# Altium PCB ResearchProject_V4_final.PcbDoc (part 1 of 2)
Units mm, origin at the board's own origin, x right, y up, seen from the top; angles counter-clockwise.
Board outline 152.49 x 130.17 mm, 4 copper layers (Top Layer, GND, 3V3, Bottom Layer), stack 0.603 mm thick; 141 components, 186 nets, 748 pads, 203 vias.
Unrouted connection lines stored in the file: 6.
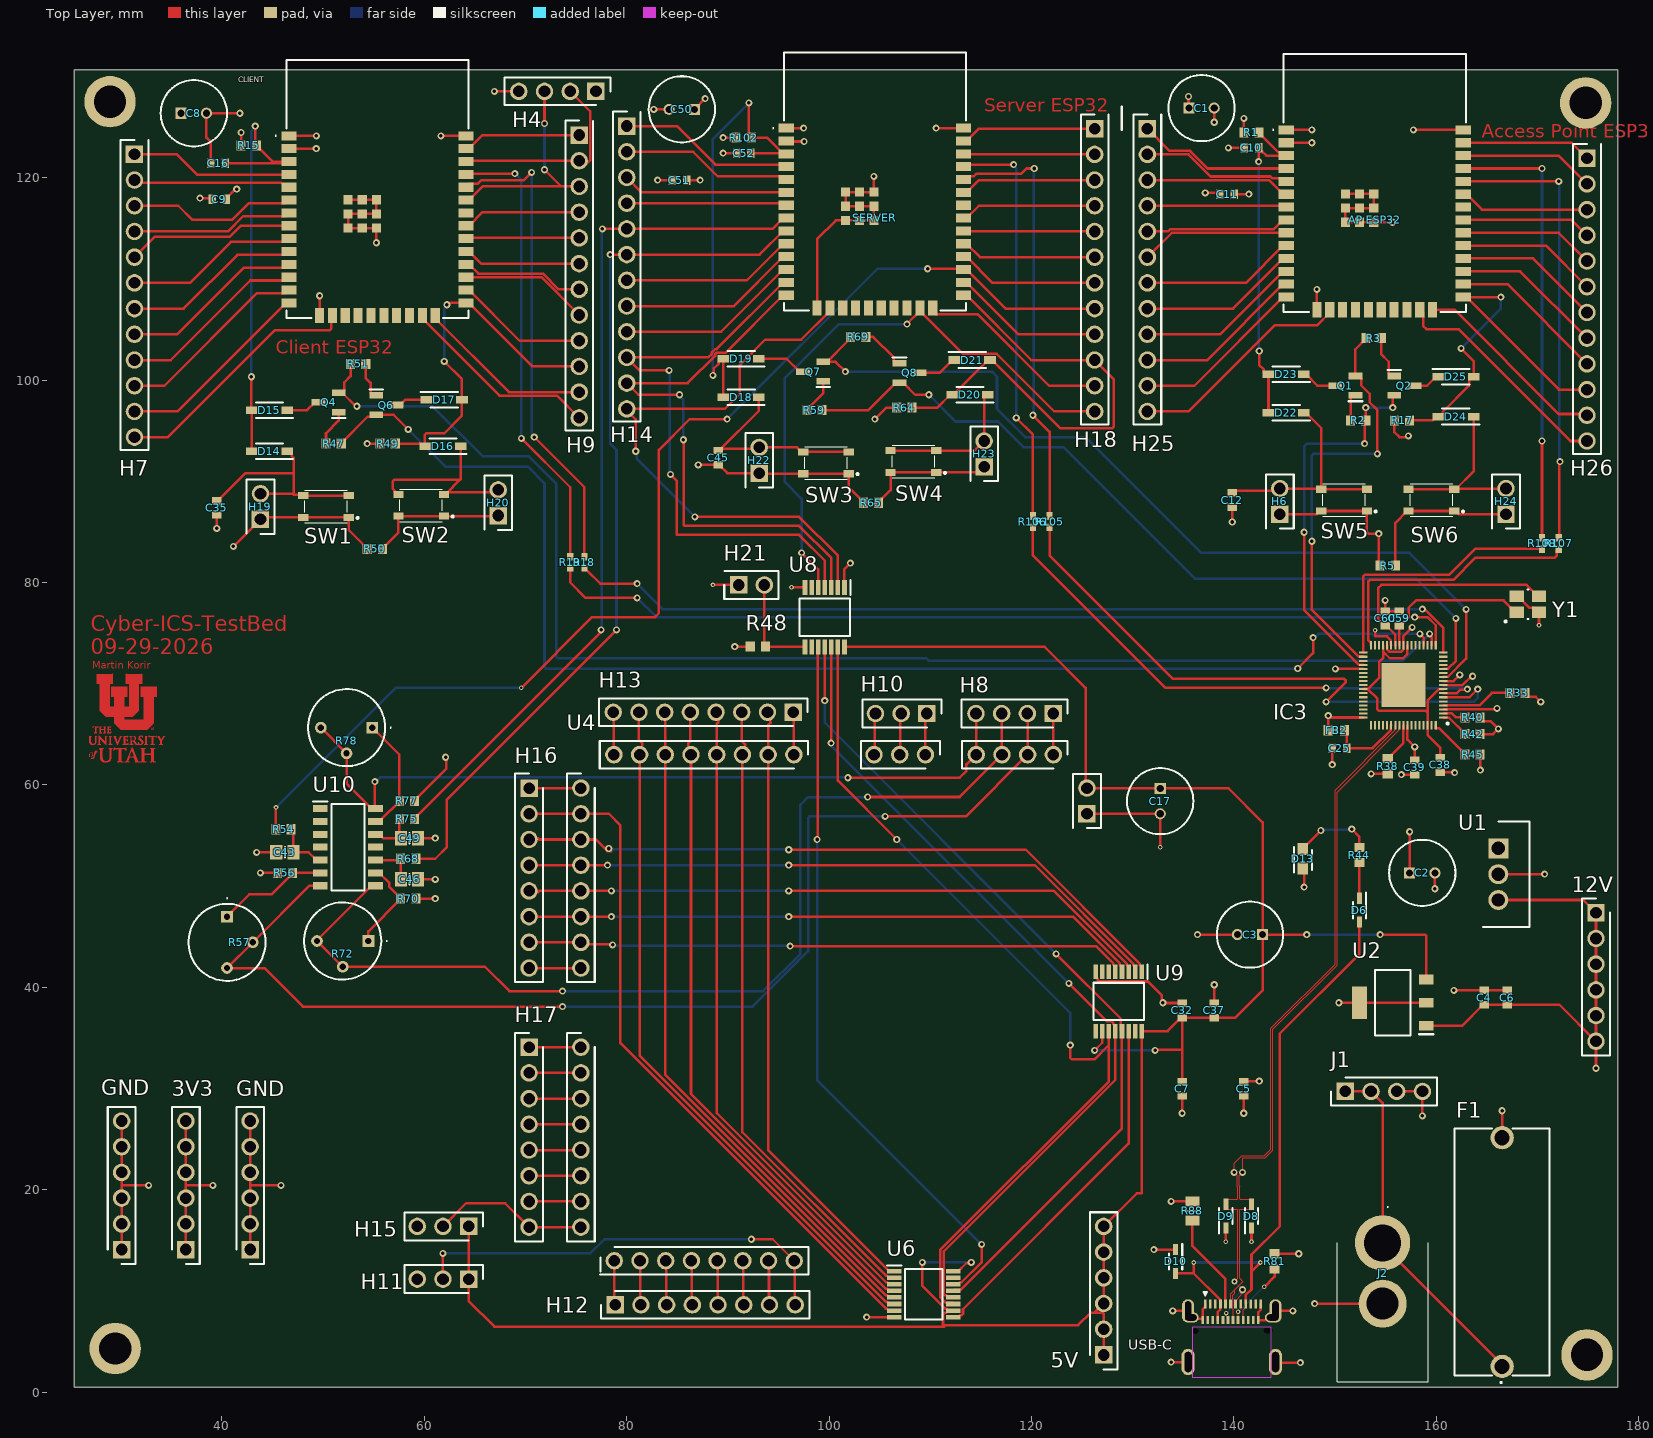
[diagram p0: Top Layer view]
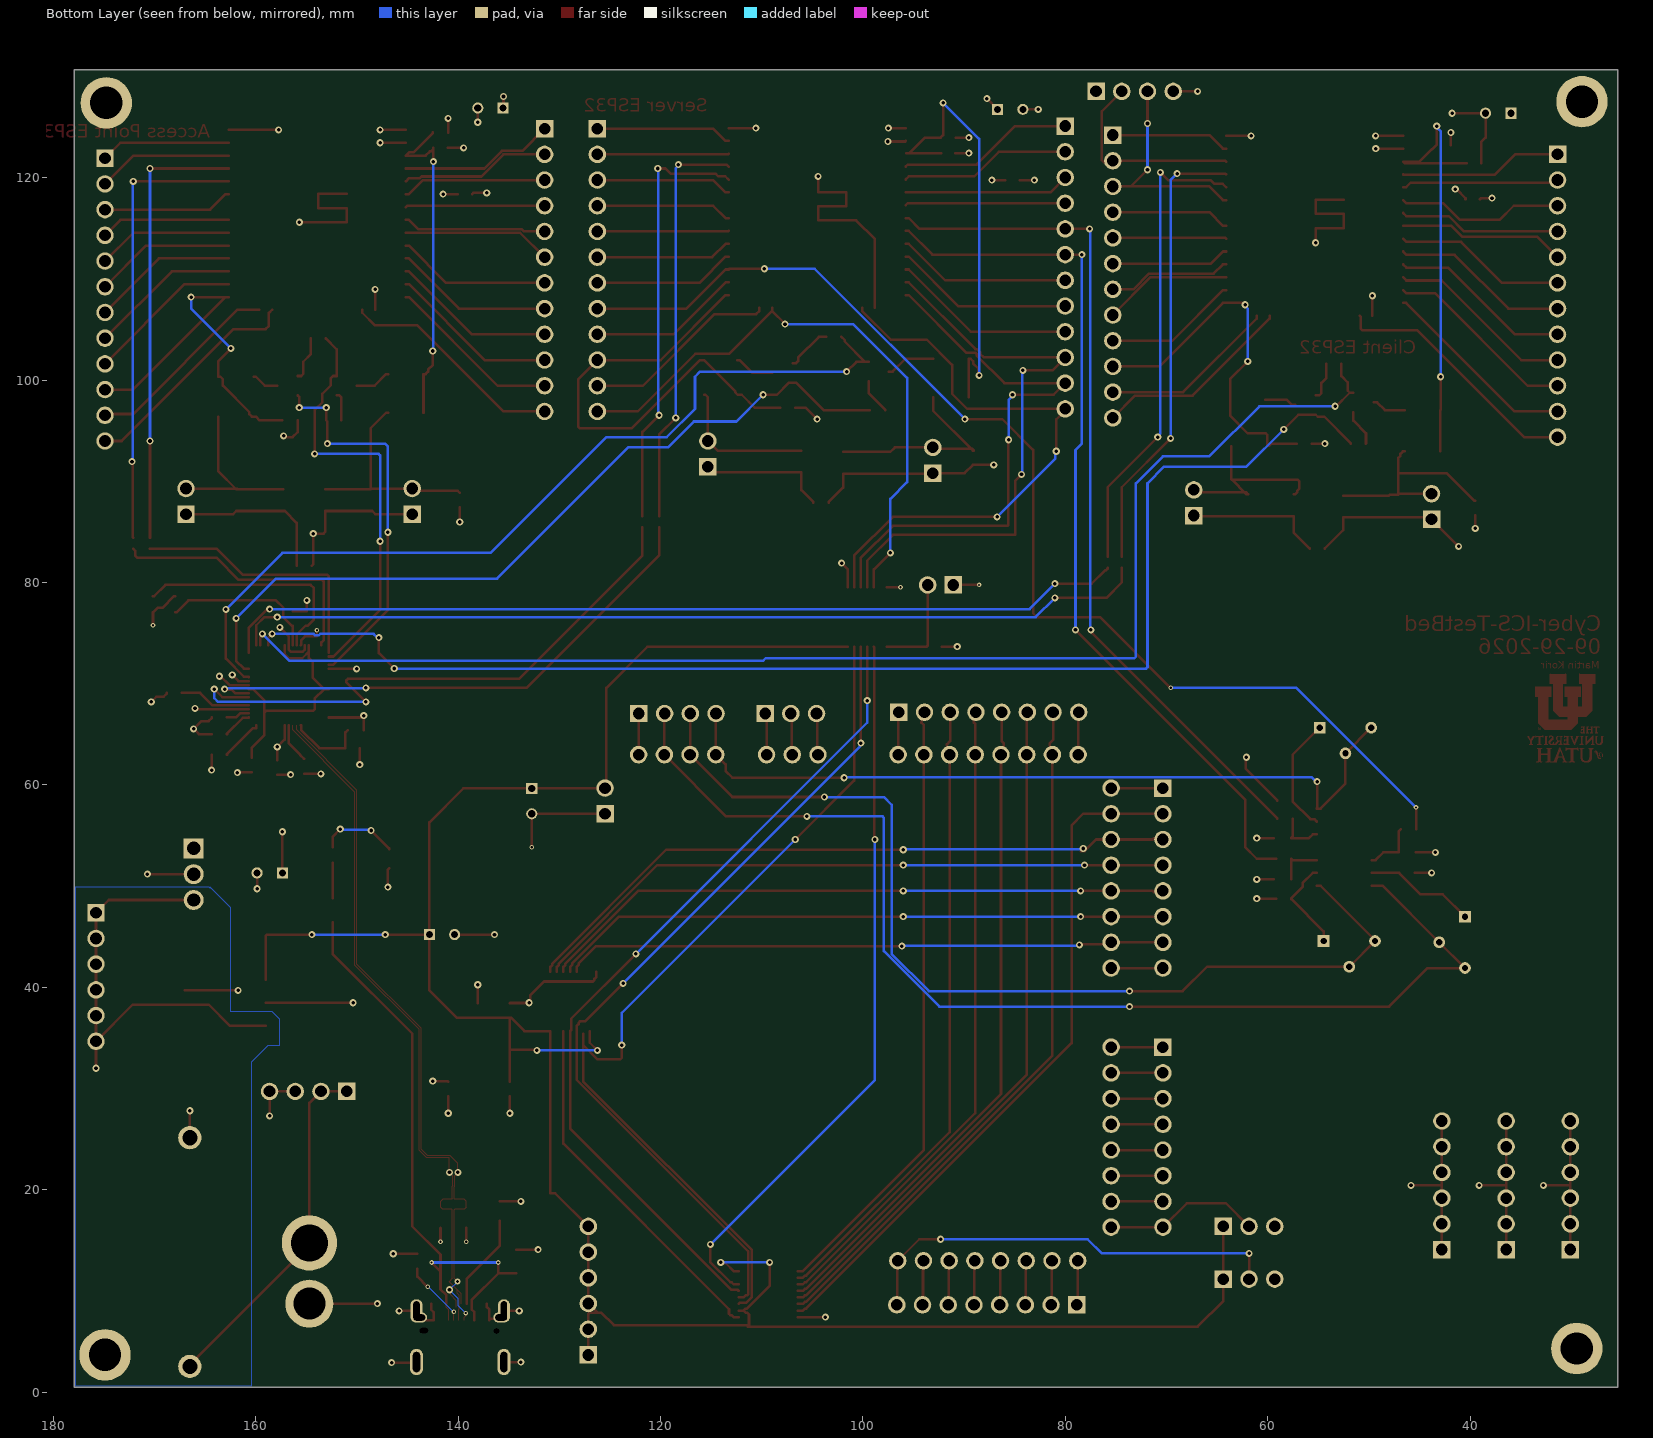
[diagram p1: Bottom Layer view, seen from below]
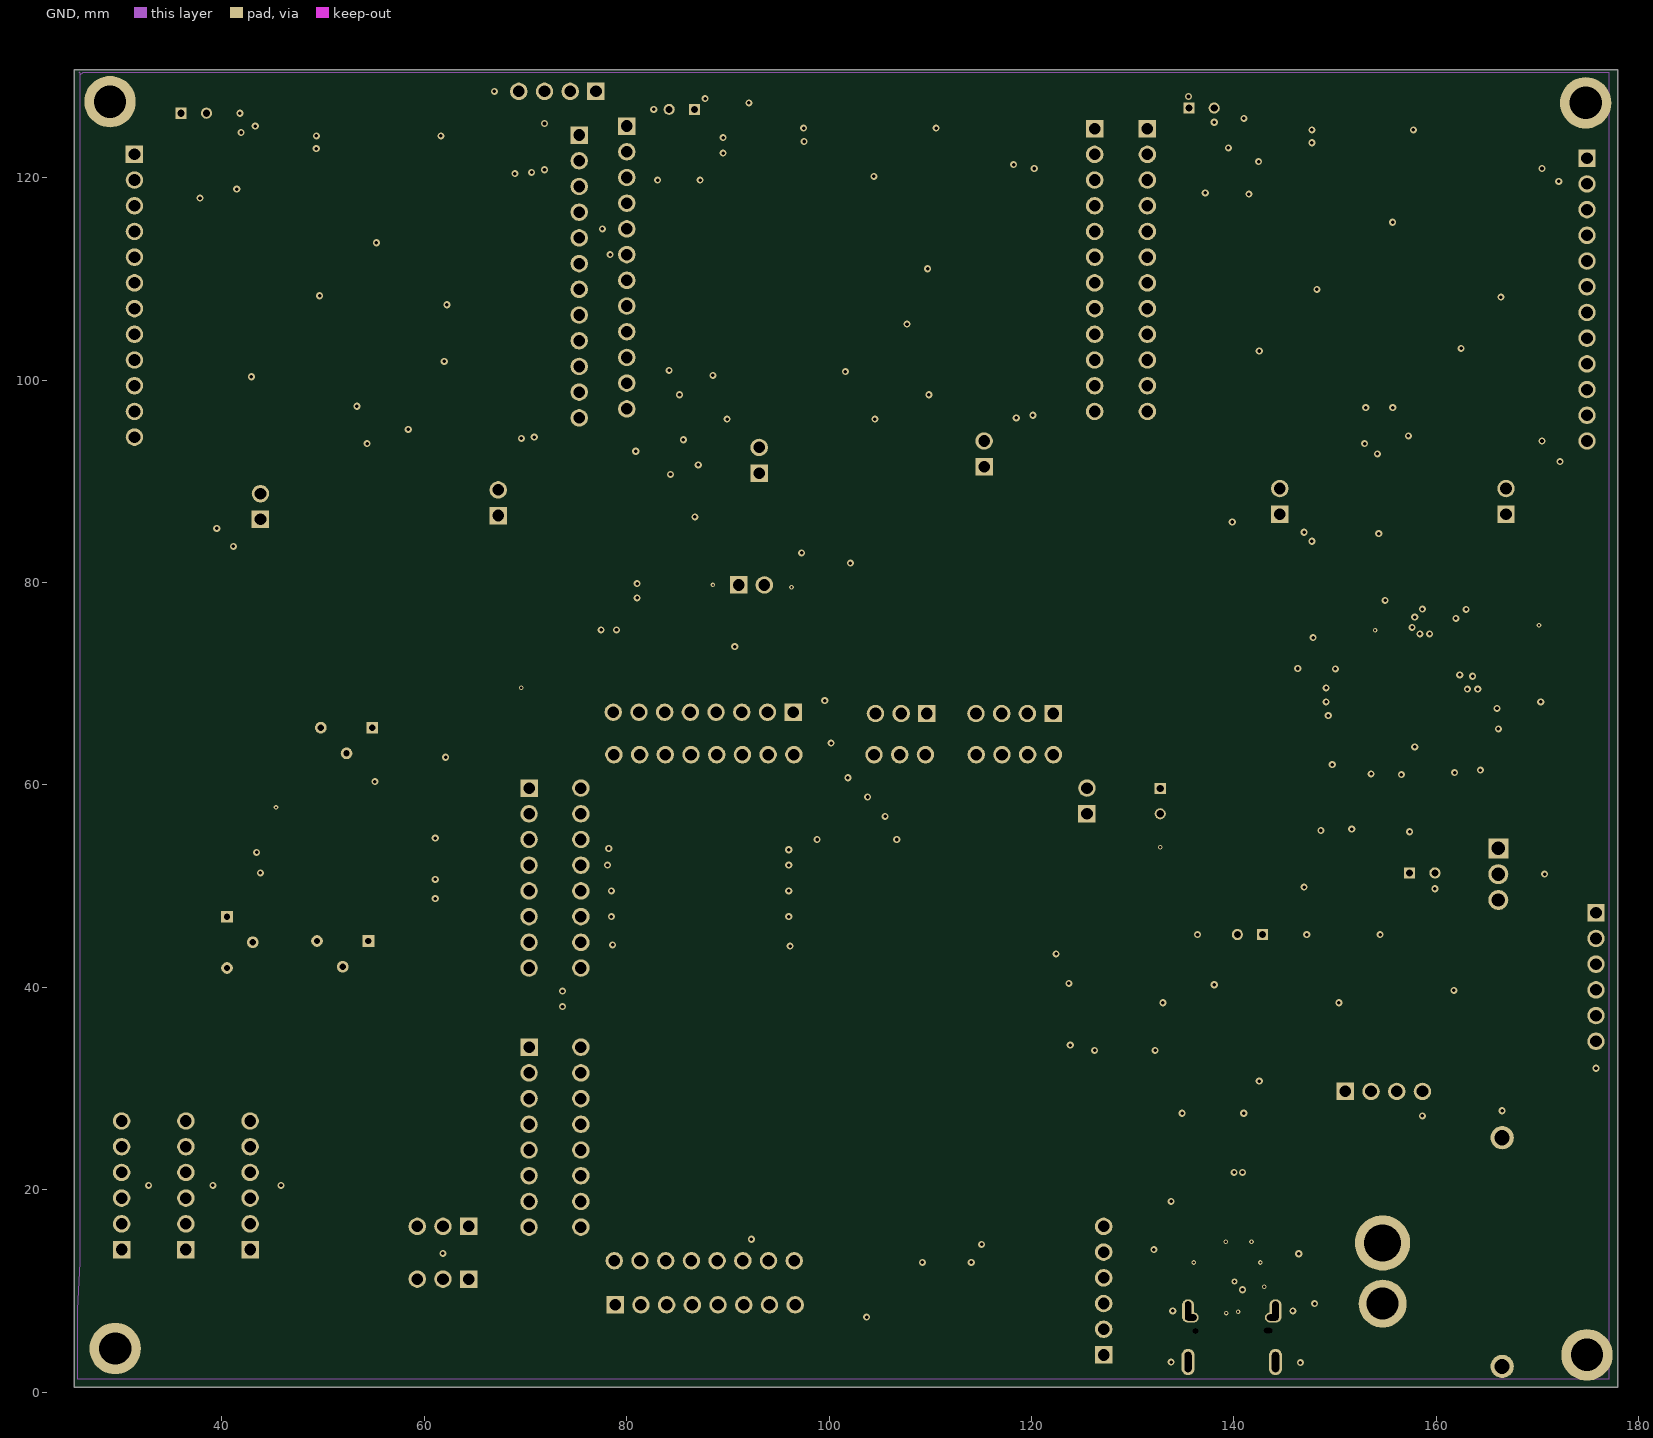
[diagram p2: GND]
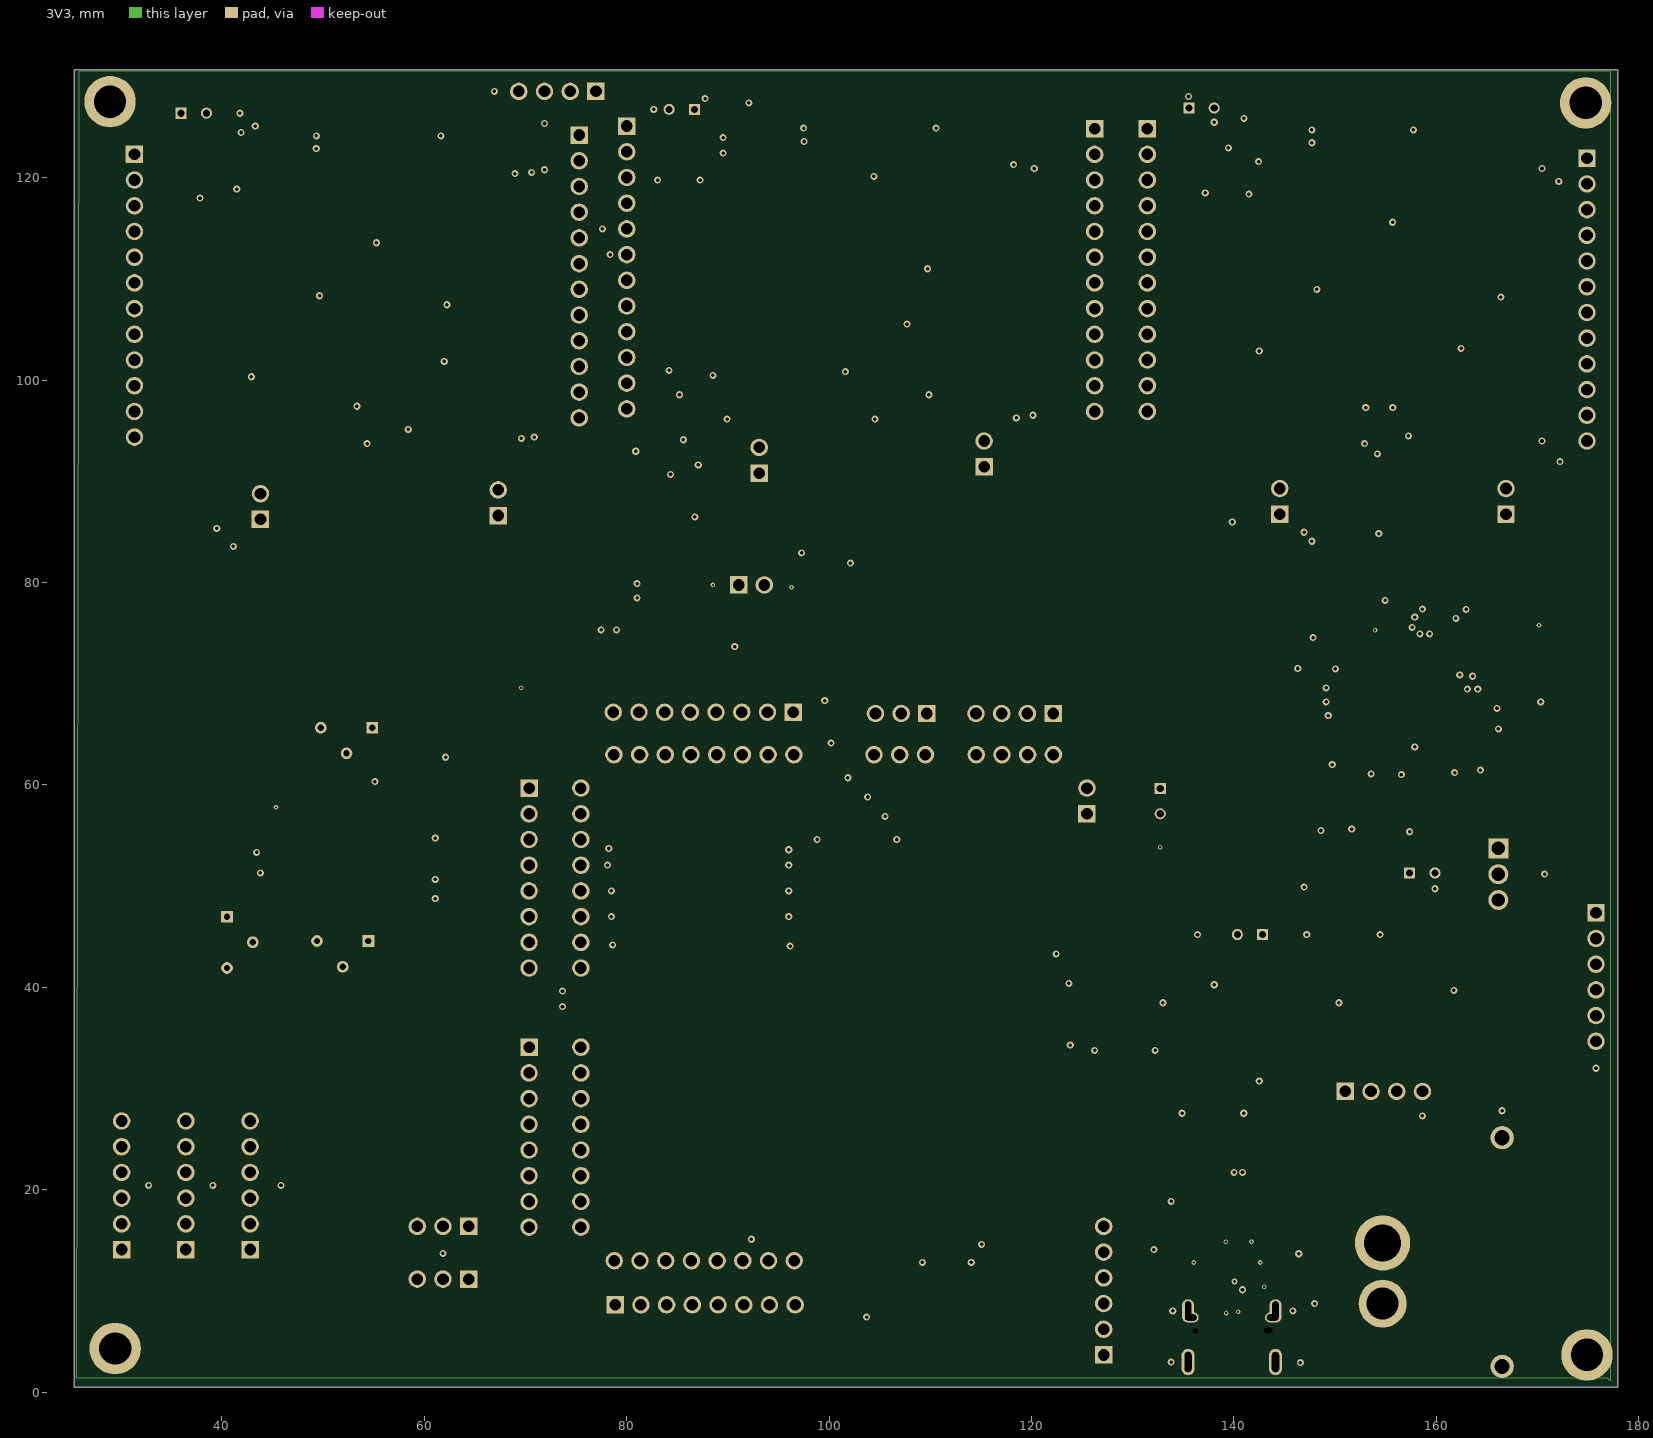
[diagram p3: 3V3]
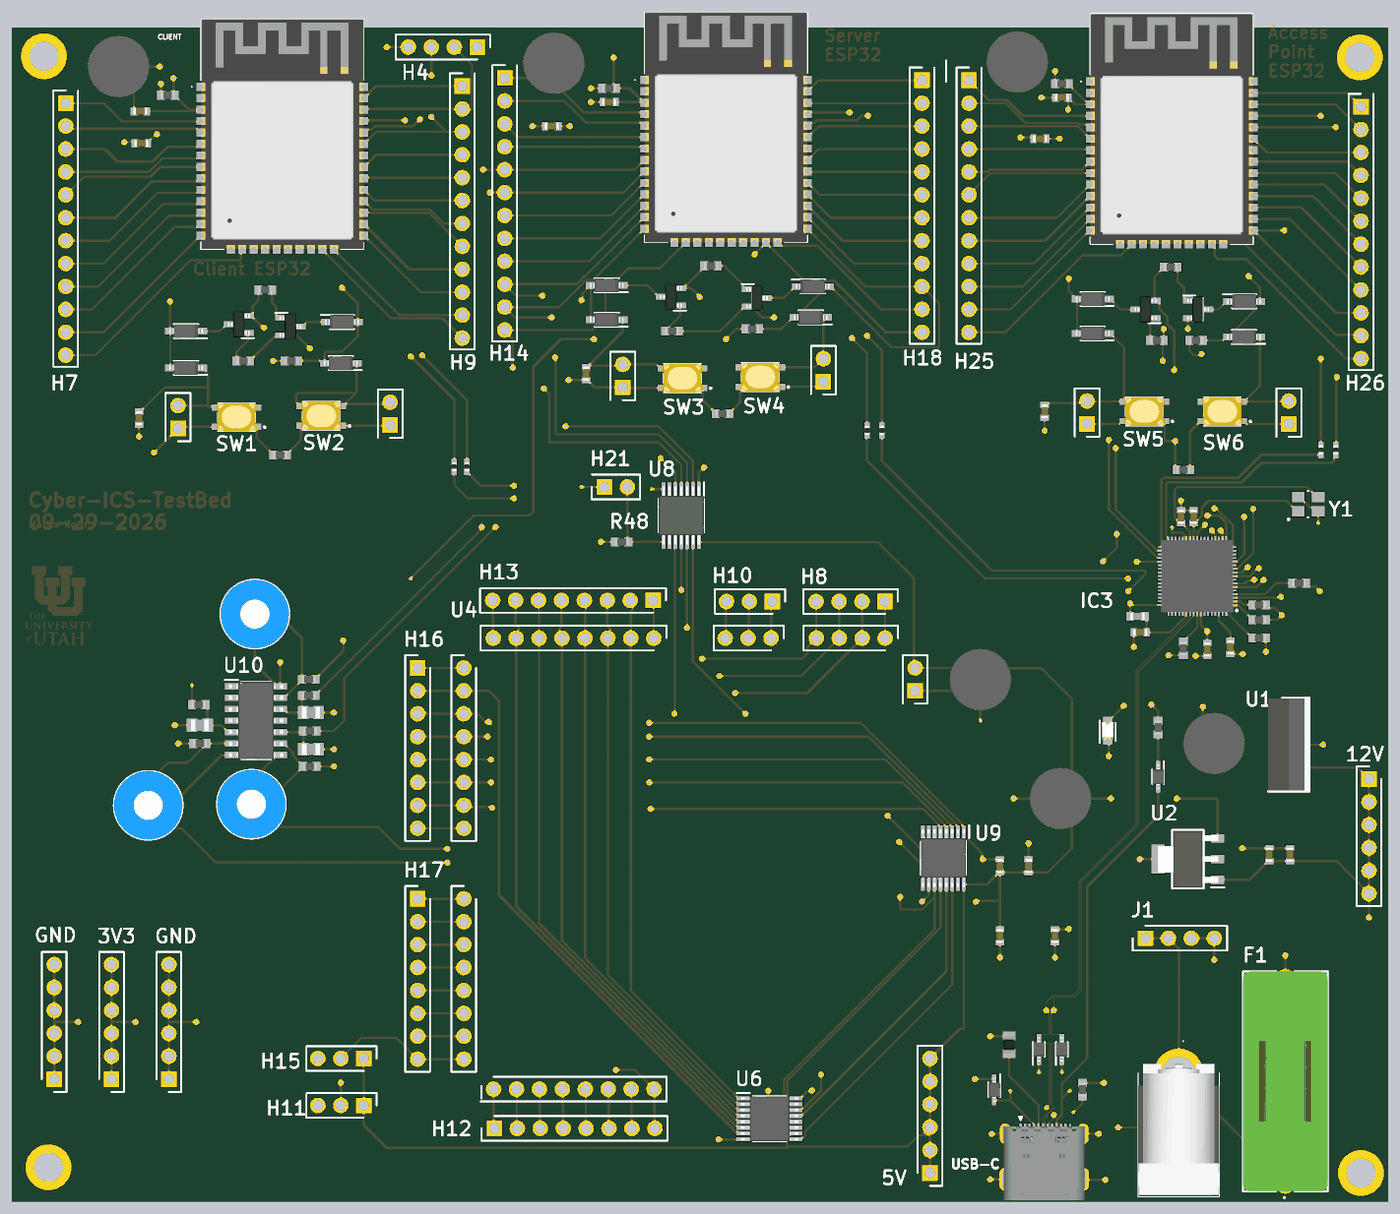
[diagram p5: 3D render of the assembled board from above, using the file's embedded part models]

## Layer stack, top to bottom
Top Solder: solder mask 0.0102, Solder Resist, Dk 3.5
Top Layer: signal copper 0.0356
Dielectric 2: prepreg 0.0711, PP-006, Dk 4.1
GND: signal copper 0.035
Dielectric 1: dielectric 0.32, FR-4, Dk 4.8
3V3: signal copper 0.035
Dielectric 3: prepreg 0.0711, PP-006, Dk 4.1
Bottom Layer: signal copper 0.0356
Bottom Solder: solder mask 0.0102, Solder Resist, Dk 3.5

## Board outline
25.424,0.508 25.424,130.683 177.913,130.683 177.913,0.508

## Design rules (kind name [scope] priority, off if disabled: settings)
BoardOutlineClearance [All] p1: gap=0.2 ignorepadtopadclearanceinfootprint=FALSE
Clearance [All] p1: gap=0.102 ignorepadtopadclearanceinfootprint=FALSE except(0.127: Arc-Via Track-Via SMDPad-Via THPad-Via Via-Via Via-Fill Via-Poly Via-Region Via-Text; 0.25: Arc-Hole Track-Hole SMDPad-Hole THPad-Hole Via-Hole Fill-Hole Poly-Hole Region-Hole Text-Hole)
ComponentClearance [All] p1: gap=0.102 collisioncheckmode=3 verticalgap=0.102 showdistances=TRUE
DiffPairsRouting [All] p1: maxlimit=0.102 minlimit=0.102 mostfreqgap=0.102 toplayer_minwidth=0.102 toplayer_maxwidth=1816.048 toplayer_prefwidth=0.102 midlayer1_minwidth=0.102 midlayer1_maxwidth=1816.048 midlayer1_prefwidth=0.102 midlayer2_minwidth=0.102 midlayer2_maxwidth=1816.048 midlayer2_prefwidth=0.102 bottomlayer_minwidth=0.102 bottomlayer_maxwidth=1816.048 bottomlayer_prefwidth=0.102 maxuncoupledlength=12.7
Height [All] p1: minheight=0 maxheight=1816.048 prefheight=12.7
HoleSize [All] p1: absolutevalues=TRUE maxlimit=6.3 minlimit=0.2 maxpercent=80.000 minpercent=20.000
HoleToHoleClearance [All] p1: gap=0.25 allowstackedmicrovias=FALSE
MinimumAnnularRing [All] p1: minimumring=0.076
MinimumSolderMaskSliver [All] p1: minsoldermaskwidth=0
PlaneClearance [All] p1: clearance=0.102
PlaneConnect PlaneConnectPowerPads [InPadClass('PowerPads')] p1: planeconnectstyle=Direct reliefexpansion=0.508 reliefentries=4 reliefconductorwidth=0.254 reliefairgap=0.254
PlaneConnect [All] p2: pad.planeconnectstyle=Relief pad.reliefexpansion=0.3 pad.reliefentries=4 pad.reliefconductorwidth=0.102 pad.reliefairgap=0.102 via.planeconnectstyle=Direct via.reliefexpansion=0.3 via.reliefentries=4 via.reliefconductorwidth=0.127 via.reliefairgap=0.127
PolygonConnect PolygonConnectPowerPads [All vs (InPadClass('PowerPads'))] p1: connectstyle=Direct reliefconductorwidth=0.254 reliefentries=4 polygonreliefangle="90 Angle" airgapwidth=0.254
PolygonConnect [All] p2: thpad.connectstyle=Relief thpad.reliefconductorwidth=0.102 thpad.reliefentries=4 thpad.polygonreliefangle="90 Angle" thpad.airgapwidth=0.102 smdpad.connectstyle=Relief smdpad.reliefconductorwidth=0.102 smdpad.reliefentries=4 smdpad.polygonreliefangle="90 Angle" smdpad.airgapwidth=0.102 via.connectstyle=Direct via.reliefconductorwidth=0.127 via.reliefentries=4 via.polygonreliefangle="90 Angle" via.airgapwidth=0.127
RoutingVias RoutingVias_USBC [All] p1: holewidth=0.225 width=0.45 viastyle="Through Hole" minholewidth=0.225 minwidth=0.45 maxholewidth=0.225 maxwidth=0.45
RoutingVias [All] p2: holewidth=0.35 width=0.7 viastyle="Through Hole" minholewidth=0.35 minwidth=0.7 maxholewidth=0.35 maxwidth=0.7
SilkToSilkClearance [All] p1: silktosilkclearance=0
SilkToSolderMaskClearance [IsPad] p1: minsilkscreentomaskgap=0.102 clearancetoexposedcopper=TRUE
SolderMaskExpansion [All] p1: expansion=0.075 istentingtop=FALSE
SupplyNets "Schematic Supply Nets_4" [InNet('3V3')] p1: voltage=0.000
SupplyNets "Schematic Supply Nets_3" [InNet('USB_VBUS')] p2: voltage=0.000
SupplyNets "Schematic Supply Nets_2" [InNet('+12.0')] p3: voltage=0.000
SupplyNets "Schematic Supply Nets_1" [InNet('+5.0')] p4: voltage=0.000
SupplyNets "Schematic Supply Nets" [InNet('GND')] p5: voltage=0.000
Width [All] p1: maxlimit=2 minlimit=0.1 preferedwidth=0.25 minimp=50.000000 maximp=50.000000 favimp=50.000000
20 further rules are at their usual default settings.

## Classes and differential pairs
differential pair USB: +USB_P -USB_N

## Components (designator, comment, footprint, x,y, rotation, side; value= is the part's Value field where it differs from the comment)
3V3 "Header" Header_1X6 36.449,14.097 r90 top (schematic designator H5)
5V "Header" Header_1X6 127.127,3.683 r90 top (schematic designator H3)
12V "Header" Header_1X6 175.768,47.371 r270 top (schematic designator H1)
"AP ESP32" "ESP32-WROOM-32E-N8" ESP32WROOM32EN8 153.911,119.454 r0 top (schematic designator U7)
C1 "100u" CAPTH6.3x11 135.549,126.873 r0 top
C2 "100u" CAPTH6.3x11 157.353,51.308 r0 top
C3 "100u" CAPTH6.3x11 142.835,45.212 r180 top
C4 "100n" CAP0603 164.719,38.989 r90 top
C5 "100n" CAP0603 140.97,29.972 r270 top
C6 "100n" CAP0603 167.005,38.989 r90 top
C7 "100n" CAP0603 134.874,29.972 r270 top
C8 "100u" CAPTH6.3x11 35.981,126.365 r0 top
C9 "1u" CAP0603 39.751,117.856 r0 top
C10 "1u" CAP0603 141.732,122.936 r180 top
C11 "1u" CAP0603 139.319,118.364 r0 top
C12 "100n" CAP0603 139.827,88.138 r90 top
C16 "1u" CAP0603 39.624,121.412 r180 top
C17 "100u" CAPTH6.3x11 132.715,59.65 r270 top
C25 "100n" CAP0603 150.42,63.627 r180 top
C32 "100n" CAP0603 134.874,37.719 r90 top
C35 "100n" CAP0603 39.497,87.376 r90 top
C37 "100n" CAP0603 138.049,37.719 r90 top
C38 "3.3u" CAP0603 160.401,61.976 r270 top
C39 "1u" CAP0603 157.861,61.722 r270 top
C43 "10u" CAP0805 46.228,53.34 r180 top
C45 "100n" CAP0603 89.027,92.329 r90 top
C46 "10u" CAP0805 58.547,50.673 r0 top
C49 "10u" CAP0805 58.547,54.737 r0 top
C50 "100u" CAPTH6.3x11 86.701,126.746 r180 top
C51 "1u" CAP0603 85.217,119.761 r180 top
C52 "1u" CAP0603 91.567,122.428 r180 top
C59 "27p" CAP0603 156.337,76.454 r90 top
C60 "27p" CAP0603 154.94,76.454 r90 top
CLIENT "ESP32-WROOM-32E-N8" ESP32WROOM32EN8 55.372,118.872 r0 top (schematic designator U3)
D6 "BAT60B" SOD323 152.4,47.625 r270 top
D8 "5V" SOD323 141.732,17.399 r90 top
D9 "5V" SOD323 139.192,17.399 r90 top
D10 "5V" SOD323 134.239,12.922 r270 top
D13 "LED" LEDM2012X80N 146.812,52.705 r90 top
D14 "1N4148" SOD123 44.704,92.964 r180 top
D15 "1N4148" SOD123 44.704,97.028 r180 top
D16 "1N4148" SOD123 61.849,93.472 r180 top
D17 "1N4148" SOD123 61.976,98.044 r0 top
D18 "1N4148" SOD123 91.313,98.298 r180 top
D19 "1N4148" SOD123 91.313,102.108 r180 top
D20 "1N4148" SOD123 113.919,98.552 r180 top
D21 "1N4148" SOD123 114.145,101.981 r0 top
D22 "1N4148" SOD123 145.161,96.774 r180 top
D23 "1N4148" SOD123 145.161,100.584 r180 top
D24 "1N4148" SOD123 161.925,96.393 r180 top
D25 "1N4148" SOD123 161.925,100.33 r0 top
F1 "Fuse" "Fuse Holder 5x20mm" 166.497,13.846 r90 top
FB2 "1.5k @ 100MHz" BEADC0603 150.114,65.405 r0 top
GND "Header" Header_1X6 30.099,14.097 r90 top (schematic designator H34)
GND "Header" Header_1X6 42.799,14.097 r90 top (schematic designator H2)
H4 "Header" Header_1X4 76.962,128.524 r180 top
H6 "Header" Header_1X2 144.526,86.741 r90 top
H7 "Header" Header_1X12 31.369,122.301 r270 top
H8 "Header" Header_1X4 122.13,67.055 r180 top
H9 "Header" Header_1X12 75.311,124.206 r270 top
H10 "Header" Header_1X3 109.661,67.055 r180 top
H11 "Header" Header_1X3 64.389,11.176 r180 top
H12 "Header" Header_1X8 78.867,8.636 r0 top
H13 "Header" Header_1X8 96.453,67.182 r180 top
H14 "Header" Header_1X12 80.01,125.095 r270 top
H15 "Header" Header_1X3 64.389,16.383 r180 top
H16 "Header" Header_1X8 70.358,59.689 r270 top
H17 "Header" Header_1X8 70.358,34.089 r270 top
H18 "Header" Header_1X12 126.238,124.841 r270 top
H19 "Header" Header_1X2 43.815,86.233 r90 top
H20 "Header" Header_1X2 67.31,86.614 r90 top
H21 "Header" Header_1X2 91.059,79.756 r0 top
H22 "Header" Header_1X2 93.091,90.805 r90 top
H23 "Header" Header_1X2 115.316,91.44 r90 top
H24 "Header" Header_1X2 166.878,86.741 r90 top
H25 "Header" Header_1X12 131.445,124.841 r270 top
H26 "Header" Header_1X12 174.879,121.92 r270 top
IC3 "FT4232HPQ-TRAY" QFN40P800X800X80-69N-D 156.737,69.863 r180 top
J1 "Header" Header_1X4 151.003,29.718 r0 top
J2 "PJ-037AH" PJ037AH 154.686,14.75 r90 top
Q1 "BC817-40" SOT23 151.003,99.441 r90 top
Q2 "BC817-40" SOT23 156.845,99.441 r270 top
Q4 "BC817-40" SOT23 50.546,97.79 r90 top
Q6 "BC817-40" SOT23 56.261,97.536 r270 top
Q7 "BC817-40" SOT23 98.425,100.838 r90 top
Q8 "BC817-40" SOT23 107.95,100.711 r270 top
R1 "10k" RESC0603 141.732,124.46 r0 top
R2 "100k" RESC0603 152.273,96.012 r180 top
R3 "100k" RESC0603 153.797,104.14 r0 top
R5 "1k" RESC0603 155.194,81.661 r180 top
R15 "10k" RESC0603 42.66,123.19 r0 top
R17 "20k" RESC0603 156.603,96.012 r180 top
R18 "0" RESC0402 75.819,82 r90 top
R19 "0" RESC0402 74.422,82 r90 top
R33 "1k" RESC0603 168.021,69.088 r0 top
R38 "12k" RESC0603 155.194,61.849 r270 top
R40 "10k" RESC0603 163.576,66.675 r180 top
R42 "10k" RESC0603 163.576,65.024 r180 top
R44 "2.2k" RESC0603 152.4,53.074 r270 top
R45 "10k" RESC0603 163.576,62.992 r0 top
R47 "100k" RESC0603 51.054,93.726 r180 top
R48 "10k" RESC0603 92.964,73.66 r180 top
R49 "20k" RESC0603 56.388,93.726 r180 top
R50 "1k" RESC0603 55.118,83.312 r180 top
R51 "100k" RESC0603 53.467,101.6 r0 top
R54 "10k" RESC0603 46.101,55.626 r0 top
R56 "12k" RESC0603 46.24,51.308 r0 top
R57 "10k" 3339P1103LF 40.513,46.99 r270 top
R59 "100k" RESC0603 98.552,97.028 r180 top
R64 "20k" RESC0603 107.43,97.282 r180 top
R65 "1k" RESC0603 104.14,87.884 r180 top
R68 "10k" RESC0603 58.42,52.705 r180 top
R69 "100k" RESC0603 102.87,104.267 r0 top
R70 "12k" RESC0603 58.42,48.768 r180 top
R72 "10k" 3339P1103LF 54.483,44.577 r180 top
R75 "10k" RESC0603 58.293,56.642 r180 top
R77 "12k" RESC0603 58.293,58.42 r180 top
R78 "10k" 3339P1103LF 54.864,65.659 r180 top
R81 "12k" RESC0603 144.018,12.935 r90 top
R88 "5.11k" RESC0805 135.89,17.907 r90 top
R102 "10k" RESC0603 91.567,123.952 r0 top
R105 "0" RESC0402 121.793,86.021 r90 top
R106 "0" RESC0402 120.142,86.021 r90 top
R107 "0" RESC0402 172.085,83.862 r90 top
R108 "0" RESC0402 170.434,83.862 r90 top
SERVER "ESP32-WROOM-32E-N8" ESP32WROOM32EN8 104.521,119.634 r0 top (schematic designator U13)
SW1 "Tactile Switch - 1" "Tactile Button 4.2mm x 3.2mm" 50.292,87.503 r180 top
SW2 "Tactile Switch - 1" "Tactile Button 4.2mm x 3.2mm" 59.69,87.63 r180 top
SW3 "Tactile Switch - 1" "Tactile Button 4.2mm x 3.2mm" 99.695,91.821 r180 top
SW4 "Tactile Switch - 1" "Tactile Button 4.2mm x 3.2mm" 108.331,91.948 r180 top
SW5 "Tactile Switch - 1" "Tactile Button 4.2mm x 3.2mm" 150.876,88.138 r180 top
SW6 "Tactile Switch - 1" "Tactile Button 4.2mm x 3.2mm" 159.512,88.138 r180 top
U1 "LD1086V33-DG" TO-220-3 166.116,53.731 r270 top
U2 "AZ1117CH2-5.0TRG1" SOT223 155.702,38.481 r180 top
U4 "eACE 5150v5" eACEv5150 125.176,62.689 r270 top
U6 "74HC595" TSSOP16 109.351,9.693 r0 top
U8 "LSF0204DPWR" TSSOP14 99.568,76.581 r270 top
U9 "74HC595" TSSOP16 128.61,38.604 r270 top
U10 "LM324" SOIC14 52.451,53.848 r0 top
USB-C "DX07S024JJ3R1300" JAE-DX07S024JJ3_V 139.783,6.031 r0 top (schematic designator CN1)
Y1 "LFXTAL056346" WE-XTAL_LFXTAL056346 169.037,77.851 r0 top

## Footprints (in the part's own frame and the unit in brackets; to place one, negate y for a bottom-side part, rotate by r counter-clockwise, add the part's x,y. Pads: shape width x height; smd on the part's side, far side on the other; paste and mask are expansions set on the pad)
3339P1103LF [mm]
  rect 1.155x1.155 hole 0.63: 1(0,0)
  round 1.155 hole 0.63: 2(2.54,2.54) 3(5.08,0)
  silkscreen extent -1.86,-3.81 6.35,3.81, body extent -1.27,-3.81 6.35,3.81, height 6.42
BEADC0603 [mm]
  rect 0.9x1 smd: 1(-0.8,0) 2(0.8,0)
  silkscreen extent 0,-0.3 0,0.3, body extent -0.8,-0.4 0.8,0.4, height 0.95
CAP0603 [mm]
  rect 0.73x0.94 smd: 1(-0.71,0) 2(0.71,0)
  body extent -0.8,-0.4 0.8,0.4, height 0.9
CAP0805 [mm]
  rect 1.2x1.45 smd: 1(-0.85,0) 2(0.85,0)
  silkscreen extent 0,-0.53 0,0.53, body extent -1,-0.63 1,0.63, height 1.1
CAPTH6.3x11 [mm]
  rect 1.1x1.1 hole 0.7: 1(0,0)
  round 1.1 hole 0.7: 2(2.5,0)
  silkscreen extent -2.02,-3.27 4.52,3.27, body extent -2.14,-3.4 4.65,3.4, height 13
eACEv5150 [mm]
  rect 1.725x1.725 hole 1.15: 1(5.54,0.3)
  round 1.725 hole 1.15: 2(3,0.3) 3(-0.3,-3.02) 4(-0.3,-5.56) 5(-0.3,-8.1) 6(-0.3,-10.64) 7(-0.3,-15.66) 8(-0.3,-18.2) 9(-0.3,-20.74) 10(-0.3,-28.66) 11(-0.3,-31.2) 12(-0.3,-33.74) 13(-0.3,-36.28) 14(-0.3,-38.82) 15(-0.3,-41.36) 16(-0.3,-43.9) 17(-0.3,-46.44) 18(3,-49.7) 19(5.54,-49.7) 20(8.08,-49.7) 21(10.62,-49.7) 22(13.16,-49.7) 23(15.7,-49.7) 24(18.24,-49.7) 25(20.78,-49.7) 26(28.6,-49.7) 27(31.14,-49.7) 28(33.68,-49.7) 29(36.22,-49.7) 30(38.76,-49.7) 31(41.3,-49.7) 32(43.84,-49.7) 33(46.38,-49.7) 34(49.7,-46.4) 35(49.7,-43.86) 36(49.7,-41.32) 37(49.7,-38.78) 38(49.7,-36.24) 39(49.7,-33.7) 40(49.7,-31.16) 41(49.7,-28.62)
  silkscreen extent -1.67,-51.07 51.07,1.68, body extent 0,-49.34 49.38,0.04, height 8.89
ESP32WROOM32EN8 [mm]
  rect 1.5x0.9 smd: 1(-8.75,5.26) 2(-8.75,3.99) 3(-8.75,2.72) 4(-8.75,1.45) 5(-8.75,0.18) 6(-8.75,-1.09) 7(-8.75,-2.36) 8(-8.75,-3.63) 9(-8.75,-4.9) 10(-8.75,-6.17) 11(-8.75,-7.44) 12(-8.75,-8.71) 13(-8.75,-9.98) 14(-8.75,-11.25) 25(8.75,-11.25) 26(8.75,-9.98) 27(8.75,-8.71) 28(8.75,-7.44) 29(8.75,-6.17) 30(8.75,-4.9) 31(8.75,-3.63) 32(8.75,-2.36) 33(8.75,-1.09) 34(8.75,0.18) 35(8.75,1.45) 36(8.75,2.72) 37(8.75,3.99) 38(8.75,5.26)
  rect 0.9x1.5 smd: 15(-5.715,-12.5) 16(-4.445,-12.5) 17(-3.175,-12.5) 18(-1.905,-12.5) 19(-0.635,-12.5) 20(0.635,-12.5) 21(1.905,-12.5) 22(3.175,-12.5) 23(4.445,-12.5) 24(5.715,-12.5)
  rect 0.9x0.9 smd: 39(-2.9,-1.06) 40(-2.9,-2.46) 41(-2.9,-3.86) 42(-1.5,-3.86) 43(-0.1,-3.86) 44(-0.1,-2.46) 45(-0.1,-1.06) 46(-1.5,-1.06) 47(-1.5,-2.46)
  silkscreen extent -10.1,-12.75 9,12.75, body extent -9,-12.75 9,12.75, height 3.13
"Fuse Holder 5x20mm" [mm]
  round 2.3 hole 1.5: 1(-11.3,0) 2(11.3,0)
  silkscreen extent -12.95,-4.7 12.2,4.7, body extent -12.2,-4.7 12.2,4.7, height 13.36
Header_1X2 [mm]
  rect 1.725x1.725 hole 1.15: 1(0,0)
  round 1.725 hole 1.15: 2(2.54,0)
  silkscreen extent -1.42,-1.38 3.95,1.37
Header_1X3 [mm]
  rect 1.725x1.725 hole 1.15: 1(0,0)
  round 1.725 hole 1.15: 2(2.54,0) 3(5.08,0)
  silkscreen extent -1.42,-1.37 6.35,1.37
Header_1X4 [mm]
  rect 1.725x1.725 hole 1.15: 1(0,0)
  round 1.725 hole 1.15: 2(2.54,0) 3(5.08,0) 4(7.62,0)
  silkscreen extent -1.42,-1.37 9.04,1.37
Header_1X6 [mm]
  rect 1.725x1.725 hole 1.15: 1(0,0)
  round 1.725 hole 1.15: 2(2.54,0) 3(5.08,0) 4(7.62,0) 5(10.16,0) 6(12.7,0)
  silkscreen extent -1.42,-1.37 14.1,1.37
Header_1X8 [mm]
  rect 1.725x1.725 hole 1.15: 1(0,0)
  round 1.725 hole 1.15: 2(2.54,0) 3(5.08,0) 4(7.62,0) 5(10.16,0) 6(12.7,0) 7(15.24,0) 8(17.78,0)
  silkscreen extent -1.42,-1.37 19.18,1.37
Header_1X12 [mm]
  rect 1.725x1.725 hole 1.15: 1(0,0)
  round 1.725 hole 1.15: 2(2.54,0) 3(5.08,0) 4(7.62,0) 5(10.16,0) 6(12.7,0) 7(15.24,0) 8(17.78,0) 9(20.32,0) 10(22.86,0) 11(25.4,0) 12(27.94,0)
  silkscreen extent -1.42,-1.37 29.21,1.37
JAE-DX07S024JJ3_V [mm] "THD, 24-Leads, Body 8.17x8.94mm, Pitch 0.5mm"
  oval 1.2x2.3 hole 0.6 slot 1.9 at 90 deg: 1(-4.32,2) 2(4.32,2)
  oval 1.5x1 hole 0.6 slot 1.1 at 0 deg: 1(-4.02,1.35) 2(4.02,1.35)
  oval 1.3x2.6 hole 0.7 slot 2 at 90 deg: 3(-4.32,-3.05) 4(4.32,-3.05)
  rrect25% 0.27x0.9 smd: A1(-2.625,2.7) A2(-2.125,2.7) A3(-1.625,2.7) A4(-1.125,2.7) A5(-0.625,2.7) A6(-0.125,2.7) A7(0.375,2.7) A8(0.875,2.7) A9(1.375,2.7) A10(1.875,2.7) A11(2.375,2.7) A12(2.875,2.7)
  rrect25% 0.27x0.8 smd: B1(2.625,1.1) B2(2.125,1.1) B3(1.625,1.1) B4(1.125,1.1) B5(0.625,1.1) B6(0.125,1.1) B7(-0.375,1.1) B8(-0.875,1.1) B9(-1.375,1.1) B10(-1.875,1.1) B11(-2.375,1.1) B12(-2.875,1.1)
  round 0 hole 0.6 unplated: H1(-3.6,0)
  round 0 hole 0.5 slot 0.85 at 0 deg unplated: H2(3.6,0.065)
  Top Layer keep-out region: -3.9,-4.55 3.9,-4.55 3.9,0.4 -3.9,0.4
  silkscreen extent -2.83,3.49 -2.43,3.89, body extent -4.47,-5.35 4.47,2.8, height 3.16
LEDM2012X80N [mm]
  rect 1.2x1.05 smd: 1(-0.95,0) 2(0.95,0)
  silkscreen extent -1.33,-0.89 1.14,0.89, body extent -1,-0.63 1,0.63, height 0.7
PJ037AH [mm]
  round 5.46 hole 3.64: 1(0,0)
  round 4.74 hole 3.16: 2(-6,0)
  silkscreen extent -13.7,-4.5 3.6,4.5, body extent -13.5,-4.5 1,4.5, height 11
QFN40P800X800X80-69N-D [mm]
  rect 0.85x0.2 smd: 1(-3.95,3.2) 2(-3.95,2.8) 3(-3.95,2.4) 4(-3.95,2) 5(-3.95,1.6) 6(-3.95,1.2) 7(-3.95,0.8) 8(-3.95,0.4) 9(-3.95,0) 10(-3.95,-0.4) 11(-3.95,-0.8) 12(-3.95,-1.2) 13(-3.95,-1.6) 14(-3.95,-2) 15(-3.95,-2.4) 16(-3.95,-2.8) 17(-3.95,-3.2) 35(3.95,-3.2) 36(3.95,-2.8) 37(3.95,-2.4) 38(3.95,-2) 39(3.95,-1.6) 40(3.95,-1.2) 41(3.95,-0.8) 42(3.95,-0.4) 43(3.95,0) 44(3.95,0.4) 45(3.95,0.8) 46(3.95,1.2) 47(3.95,1.6) 48(3.95,2) 49(3.95,2.4) 50(3.95,2.8) 51(3.95,3.2)
  rect 0.2x0.85 smd: 18(-3.2,-3.95) 19(-2.8,-3.95) 20(-2.4,-3.95) 21(-2,-3.95) 22(-1.6,-3.95) 23(-1.2,-3.95) 24(-0.8,-3.95) 25(-0.4,-3.95) 26(0,-3.95) 27(0.4,-3.95) 28(0.8,-3.95) 29(1.2,-3.95) 30(1.6,-3.95) 31(2,-3.95) 32(2.4,-3.95) 33(2.8,-3.95) 34(3.2,-3.95) 52(3.2,3.95) 53(2.8,3.95) 54(2.4,3.95) 55(2,3.95) 56(1.6,3.95) 57(1.2,3.95) 58(0.8,3.95) 59(0.4,3.95) 60(0,3.95) 61(-0.4,3.95) 62(-0.8,3.95) 63(-1.2,3.95) 64(-1.6,3.95) 65(-2,3.95) 66(-2.4,3.95) 67(-2.8,3.95) 68(-3.2,3.95)
  rect 4.35x4.35 smd: 69(0,0)
  silkscreen extent -4.47,3.7 -4.28,3.9, body extent -4.05,-4.05 4.05,4.05, height 0.8
RESC0402 [mm]
  rect 0.75x0.6 smd: 1(-0.55,0) 2(0.55,0)
  body extent -0.5,-0.25 0.5,0.25, height 0.4
RESC0603 [mm]
  rect 0.9x1 smd: 1(-0.75,0) 2(0.75,0)
  body extent -0.77,-0.4 0.78,0.4, height 0.45
RESC0805 [mm]
  rect 1x1.4 smd: 1(-0.95,0) 2(0.95,0)
  silkscreen extent 0,-0.53 0,0.53, body extent -1,-0.63 1,0.63, height 0.5
SOD123 [mm]
  rect 1.15x0.75 smd: 1(-1.75,0) 2(1.75,0)
  silkscreen extent -2.32,-0.77 1.35,0.77, body extent -1.85,-0.77 1.85,0.77, height 1.35
SOD323 [mm]
  rect 1.1x0.5 smd: 1(-1.175,0) 2(1.175,0)
  silkscreen extent -1.73,-0.65 0.8,0.65, body extent -1.33,-0.65 1.33,0.65, height 1.1
SOIC14 [mm]
  rect 1.462x0.7 smd: 1(-2.719,3.81) 2(-2.719,2.54) 3(-2.719,1.27) 4(-2.719,0) 5(-2.719,-1.27) 6(-2.719,-2.54) 7(-2.719,-3.81) 8(2.719,-3.81) 9(2.719,-2.54) 10(2.719,-1.27) 11(2.719,0) 12(2.719,1.27) 13(2.719,2.54) 14(2.719,3.81)
  silkscreen extent -3.45,-4.28 1.64,4.51, body extent -3,-4.28 3,4.28, height 1.8
SOT23 [mm]
  rect 0.65x1.35 smd: 1(-0.96,-1) 2(0.96,-1) 3(0,1)
  silkscreen extent -1.54,-1.68 -1.54,-0.33, body extent -1.45,-1.2 1.45,1.2, height 0.95
SOT223 [mm]
  rect 1.45x0.95 smd: 1(-3.3,2.29) 2(-3.3,0) 3(-3.3,-2.29)
  rect 1.45x3.25 smd: 4(3.3,0)
  silkscreen extent -4.03,-3.25 1.75,3.25, body extent -3.35,-3.15 3.35,3.15, height 1.8
"Tactile Button 4.2mm x 3.2mm" [mm]
  rect 1x0.7 smd: 1(-2.25,1.075) 2(2.25,1.075) 3(-2.25,-1.075) 4(2.25,-1.075)
  silkscreen extent -3.22,-1.6 2.1,1.61, body extent -2.3,-1.6 2.3,1.6, height 2.6
TO-220-3 [mm]
  rect 1.98x1.98 hole 1.32: 1(0,0)
  round 1.98 hole 1.32: 2(2.55,0) 3(5.1,0)
  silkscreen extent -2.65,-1.53 7.75,3.07, body extent -2.55,-1.53 7.65,3.07, height 19.22
TSSOP14 [mm]
  rect 1.475x0.45 smd: 1(-2.938,1.95) 2(-2.938,1.3) 3(-2.938,0.65) 4(-2.938,0) 5(-2.938,-0.65) 6(-2.938,-1.3) 7(-2.938,-1.95) 8(2.938,-1.95) 9(2.938,-1.3) 10(2.938,-0.65) 11(2.938,0) 12(2.938,0.65) 13(2.938,1.3) 14(2.938,1.95)
  silkscreen extent -3.67,-2.5 1.85,2.52, body extent -3.2,-2.5 3.2,2.5, height 1.13
TSSOP16 [mm]
  rect 1.45x0.45 smd: 1(-2.925,2.275) 2(-2.925,1.625) 3(-2.925,0.975) 4(-2.925,0.325) 5(-2.925,-0.325) 6(-2.925,-0.975) 7(-2.925,-1.625) 8(-2.925,-2.275) 9(2.925,-2.275) 10(2.925,-1.625) 11(2.925,-0.975) 12(2.925,-0.325) 13(2.925,0.325) 14(2.925,0.975) 15(2.925,1.625) 16(2.925,2.275)
  silkscreen extent -3.65,-2.5 1.85,2.85, body extent -3.2,-2.5 3.2,2.5, height 1.2
WE-XTAL_LFXTAL056346 [mm]
  rect 1.4x1.15 smd paste+0 mask+0.102: 1(-1.1,-0.8) 2(1.1,-0.8) 3(1.1,0.8) 4(-1.1,0.8)
  silkscreen extent -2.3,-1.8 0.05,1.45

## Part data
3V3 5V 12V GND GND: library part "6-Pin Header", "6-Pin Header"
"AP ESP32" CLIENT SERVER: "Integrated Circuit", Manufacturer_Name="Espressif Systems", Mouser Part Number=356-ESP32WRM32E164PH, Datasheet Link=https://www.google.com/url?sa=t&rct=j&q=&esrc=s&source=web&cd=&ved=2ahUKEwjLw4ysybv2AhXFzIUKHZUbB64QFnoECCwQAQ&url=https%3A%2F%2Fwww.espressif.com%2Fsites%2Fdefault%2Ffiles%2Fdocumentation%2Fesp32-wroom-32e_esp32-wroom-32ue_datasheet_en.pdf&usg=AOvVaw1xSL, Height=3.25mm, Manufacturer_Part_Number=ESP32-WROOM-32E-N8, Mouser Price/Stock=https://www.mouser.co.uk/ProductDetail/Espressif-Systems/ESP32-WROOM-32E-N8?qs=Li%252BoUPsLEnsLnZW%252BGLgUhw%3D%3D
C1 C4 C5 C6 C7 C8 C9 C10 C11 C12 C16 C25 C32 C35 C37 C38 C39 C43 C45 C46 C49 C50 C51 C52 C59 C60: library part "Capacitor - Non Polarized", "Non Polarized Capacitor"
C2 C3 C17: library part "Capacitor - Polarized", "Polarized Capacitor"
D6: "Schottky Diodes & Rectifiers 10 V 3000 mA", ComponentLink1Description=Datasheet, ComponentLink1URL=https://www.smc-diodes.com/propdf/1N4148W%20N0571%20REV.E.pdf
D8 D9 D10: library part "TVS Diode", "TVS Diode"
D13: "General Purpose LED", ComponentLink1Description=Datasheet, ComponentLink1URL=https://www.smc-diodes.com/propdf/1N4148W%20N0571%20REV.E.pdf
D14 D15 D16 D17 D18 D19 D20 D21 D22 D23 D24 D25: "1N4148 General Purpose Switching Diode", ComponentLink1Description=Datasheet, ComponentLink1URL=https://www.smc-diodes.com/propdf/1N4148W%20N0571%20REV.E.pdf
FB2: library part "Ferrite Bead", "Ferrite Bead"
H4 H8 J1: library part "4-Pin Header", "4-Pin Header"
H6 H19 H20 H21 H22 H23 H24: library part "2-Pin Header", "2-Pin Header"
H7 H9 H14 H18 H25 H26: library part "12-Pin Header", "12-Pin Header"
H10 H11 H15: library part "3-Pin Header", "3-Pin Header"
H12 H13 H16 H17: library part "8-Pin Header", "8-Pin Header"
IC3: "Integrated Circuit", Manufacturer_Name="FTDI Chip", Mouser Part Number=895-FT4232HPQ-TRAY, Datasheet Link=https://www.ftdichip.com/Support/Documents/DataSheets/ICs/DS_FT4233HP.pdf, Height=0.8mm, Manufacturer_Part_Number=FT4232HPQ-TRAY, Mouser Price/Stock=https://www.mouser.co.uk/ProductDetail/FTDI/FT4232HPQ-TRAY?qs=DRkmTr78QATL4FSPfVZC7Q%3D%3D
J2: "Connector", Manufacturer_Name="Same Sky", Mouser Part Number=490-PJ-037AH, Arrow Part Number=PJ-037AH, Arrow Price/Stock=https://www.arrow.com/en/products/pj-037ah/cui-devices?region=nac, Datasheet Link=https://www.arrow.com/en/products/pj-037ah/cui-devices, Height=11.2mm, Manufacturer_Part_Number=PJ-037AH, Mouser Price/Stock=https://www.mouser.co.uk/ProductDetail/CUI-Devices/PJ-037AH?qs=WyjlAZoYn50M7m1AkzfPaQ%3D%3D
Q1 Q2 Q4 Q6 Q7 Q8: "Transistor BJT NPN", Arrow Part Number=BC817-40,215, Manufacturer_Name=Nexperia, Mouser Part Number=771-BC817-40-T/R, Arrow Price/Stock=https://www.arrow.com/en/products/bc817-40215/nexperia?region=europe, Datasheet Link=https://assets.nexperia.com/documents/data-sheet/BC817_SER.pdf, Height=1.1mm, Manufacturer_Part_Number=BC817-40,215, Mouser Price/Stock=https://www.mouser.co.uk/ProductDetail/Nexperia/BC817-40215?qs=me8TqzrmIYU%252B245p8hOLaQ%3D%3D
R1 R2 R3 R5 R15 R17 R18 R19 R33 R38 R40 R42 R44 R45 R47 R48 R49 R50 R51 R54 R56 R59 R64 R65 R68 R69 R70 R75 R77 R81 R102 R105 R106 R107 R108: library part Resistor, "Resistor"
R57 R72 R78: library part Potentiometer, "Potentionmeter"
R88: library part Resistor_1, "Resistor"
SW1 SW2 SW3 SW4 SW5 SW6: "Tactile Pushbutton - Contact Pad"
U1: "Power Supply", Manufacturer_Name=STMicroelectronics, Mouser Part Number=511-LD1086V33-DG, Arrow Part Number=LD1086V33-DG, Arrow Price/Stock=https://www.arrow.com/en/products/ld1086v33-dg/stmicroelectronics?region=europe, Datasheet Link=https://componentsearchengine.com/Datasheets/1/LD1086V33-DG.pdf, Height=4.6mm, Manufacturer_Part_Number=LD1086V33-DG, Mouser Price/Stock=https://www.mouser.co.uk/ProductDetail/STMicroelectronics/LD1086V33-DG?qs=kWQV1gtkNncEt67PbJzViw%3D%3D
U2: "5.0V Linear Voltage Regulator"
U6 U9: "Shift Register"
U8: "Integrated Circuit", Manufacturer_Name="Texas Instruments", Mouser Part Number=595-LSF0204DPWR, Arrow Part Number=LSF0204DPWR, Arrow Price/Stock=https://www.arrow.com/en/products/lsf0204dpwr/texas-instruments?region=nac, Datasheet Link=http://www.ti.com/lit/gpn/lsf0204d, Height=1.2mm, Manufacturer_Part_Number=LSF0204DPWR, Mouser Price/Stock=https://www.mouser.co.uk/ProductDetail/Texas-Instruments/LSF0204DPWR?qs=ADSrZYdIRCcP9%252B%2FUL5YMBQ%3D%3D
U10: library part LMV324, "Quad General Purpose Op Amp", ComponentLink1Description=Datasheet, ComponentLink1URL=https://www.ti.com/lit/ds/symlink/lm224.pdf?
USB-C: library part CMP-002-00065-3, "USB-C Connector, 20 V, 1.25 A, -30 to 80 degC, RoHS, Tape and Reel", Connector Type=USB-C, Gender=Receptacle, Pins=28
Y1: library part CMP-004-000000-1, Package=None, Availability=Unavailable, Component Type=Standard, Design Item ID=LFXTAL056346, MF="{'manufacturer': u'IQD Frequency Products'}", MP=LFXTAL056346, Pin Count=4, Price=None, Source=LFXTAL056346.SchLib

## Free pads (board coordinates)
  round 5.08 hole 3.2 unplated: M3_hole(28.956,127.508) M3_hole(29.464,4.318) M3_hole(174.752,127.381) M3_hole(174.879,3.683)

## Via types
v1: diameter 0.7, hole 0.35, Top Layer to Bottom Layer, 188 vias
v2: diameter 0.45, hole 0.225, Top Layer to Bottom Layer, 14 vias
v3: diameter 0.6, hole 0.3, Top Layer to Bottom Layer, 1 vias

## Nets (pads, with @x,y where several pads share a name; then routed paths per layer and width w, separated by ;. In a path a pad name is that pad's centre, name@x,y a point inside that pad or via, vN(x,y) a via of type N, cw(c..) or ccw(c..) an arc to the next point about the centre after c; other vN are vias at no path point)
3V3: 3V3.1 3V3.2 3V3.3 3V3.4 3V3.5 3V3.6 "AP ESP32.2" C1.1 C2.1 C5.1 C8.1 C9.1 C11.1 C39.1 C50.1 C51.1 CLIENT.2 FB2.1 H4.1 IC3.10 IC3.26 IC3.30 IC3.39 IC3.51 IC3.61 R1.1 R15.1 R17.2 R33.2 R40.1 R42.1 R45.2 R48.2 R49.2 R64.2 R102.1 SERVER.2 U1.2 U8.1 | length 80
  Top Layer w0.25: 3V3.1@36.449,14.097 3V3.2@36.449,16.637 3V3.3@36.449,19.177 36.449,20.435 ; 3V3.4@36.449,21.705 36.449,20.435 ; 3V3.4@36.449,21.717 3V3.5@36.449,24.257 3V3.6@36.449,26.797 ; v1(37.846,117.983) 38.914,117.983 C9.1@39.041,117.856 ; v1(39.116,20.435) 36.449,20.435 ; R15.1@41.91,123.19 v1(41.91,124.46) ; CLIENT.2@46.622,122.862 v1(49.329,122.862) ; v1(54.356,93.726) R49.2@55.638,93.726 ; C51.1@85.927,119.761 v1(87.249,119.761) ; C50.1@86.701,126.746 v1(87.757,127.802) ; v1(89.535,123.952) R102.1@90.817,123.952 ; v1(90.678,73.66) R48.2@92.214,73.66 ; SERVER.2@95.771,123.624 95.824,123.571 v1(97.536,123.571) ; U8.1@101.518,79.519 101.518,81.325 v1(102.108,81.915) ; v1(104.521,96.139) 105.664,97.282 R64.2@106.68,97.282 ; v1(135.509,128.016) 135.509,126.913 C1.1@135.549,126.873 ; v1(137.16,118.491) 138.482,118.491 C11.1@138.609,118.364 ; C5.1@140.97,30.682 140.996,30.708 142.468,30.708 v1(142.494,30.734) ; R1.1@140.982,124.46 v1(140.982,125.845) ; 145.161,123.444 v1(147.701,123.444) ; FB2.1@149.314,65.405 v1(149.314,66.84) 149.436,66.84 149.613,66.663 IC3.51@152.787,66.663 ; v1(150.025,71.463) IC3.39@152.787,71.463 ; IC3.30@155.137,73.813 155.162,73.788 155.162,73.343 155.343,73.161 156.531,73.161 156.712,73.343 156.712,73.788 IC3.26@156.737,73.813 156.737,74.695 v1(157.607,75.565) ; R17.2@155.853,96.012 155.853,94.845 156.337,94.361 157.099,94.361 v1(157.226,94.488) ; IC3.61@157.137,65.913 157.137,64.478 v1(157.861,63.754) C39.1@157.861,62.432 ; C2.1@157.353,51.308 v1(157.353,55.372) ; IC3.10@160.687,70.263 161.707,70.263 162.306,70.862 v1(162.306,70.866) ; R45.2@164.326,62.992 164.338,62.98 v1(164.338,61.468) ; R42.1@164.326,65.024 165.599,65.024 166.107,65.532 v1(166.116,65.532) 165.348,66.3 164.651,66.3 164.326,66.625 R40.1@164.326,66.675 ; U1.2@166.116,51.181 v1(170.688,51.181) ; R33.2@168.771,69.088 168.771,69.038 169.096,68.713 169.793,68.713 v1(170.307,68.199)
+5.0: 5V.1 5V.2 5V.3 5V.4 5V.5 5V.6 C3.1 C7.1 C17.1 C32.1 C37.1 H11.1 H15.1 U2.3 U4.2 U6.10 U6.16 U8.14 U9.10 U9.16 | length 243.1
  Top Layer w0.25: H15.1@64.389,16.383 H11.1@64.389,11.176 64.389,9.017 66.929,6.477 111.398,6.477 111.252,6.623 ; U8.14@101.518,73.643 121.302,73.643 125.349,69.596 125.349,59.816 U4.2@125.476,59.689 132.676,59.689 C17.1@132.715,59.65 139.486,59.65 142.835,56.301 C3.1@142.835,45.212 ; v1(109.22,12.827) 109.22,10.504 111.457,8.266 111.578,8.266 U6.10@111.776,8.068 ; U6.10@112.276,8.068 U6.10@111.776,8.068 ; U6.16@112.276,11.968 112.776,11.968 113.549,12.741 113.96,12.741 v1(114.046,12.827) ; v1(126.238,33.782) 126.985,34.529 U9.10@126.985,35.679 ; 5V.2@127.102,5.921 127.127,5.896 5V.1@127.127,3.683 ; 5V.2@127.127,6.223 127.127,7.728 126.981,7.874 126.238,7.874 ; v1(132.207,33.782) 132.27,33.846 134.874,33.846 ; C7.1@134.874,30.682 134.874,33.846 ; v1(147.193,45.212) C3.1@142.835,45.212 ; v1(154.432,45.212) 158.856,45.212 159.002,45.066 U2.3@159.002,40.771 ; 111.252,6.623 124.606,6.623 125.857,7.874 126.238,7.874 ; 111.252,6.623 111.252,7.664 111.457,7.87 111.578,7.87 U6.10@111.776,8.068 ; 126.238,7.874 5V.3@127.127,8.763 5V.4@127.127,11.303 5V.5@127.127,13.843 5V.6@127.127,16.383 130.404,19.66 130.885,19.66 U9.16@130.885,35.679 133.439,35.679 134.769,37.009 C32.1@134.874,37.009 ; 134.874,33.846 C32.1@134.874,37.009 ; C32.1@134.874,37.009 C37.1@138.049,37.009 140.133,37.009 142.835,39.711 C3.1@142.835,45.212
  Bottom Layer w0.25: v1(109.22,12.827) v1(114.046,12.827) ; v1(126.238,33.782) v1(132.207,33.782) ; v1(147.193,45.212) v1(154.432,45.212)
+12.0: 12V.1 12V.2 12V.3 12V.4 12V.5 12V.6 C4.1 C6.1 F1.2 U1.3 U2.1 | length 47.3
  Top Layer w0.25: U2.1@159.002,36.191 162.526,36.191 164.614,38.279 C4.1@164.719,38.279 C6.1@167.005,38.279 172.16,38.279 12V.6@175.768,34.671 ; U1.3@166.116,48.631 174.508,48.631 12V.1@175.768,47.371 12V.2@175.768,44.831 12V.3@175.768,42.291 12V.4@175.768,39.751 12V.5@175.768,37.211 12V.6@175.768,34.671 ; F1.2@166.497,25.146 v1(166.497,27.813) ; v1(175.768,32.004) 12V.6@175.768,34.671
AP_DTR: IC3.38 Q2.2 R2.1 | length 37.9
  Top Layer w0.25: v1(146.939,84.963) 146.939,77.266 152.317,71.888 152.762,71.888 IC3.38@152.787,71.863 ; v1(152.908,93.726) 152.908,95.897 R2.1@153.023,96.012 v1(153.023,97.27) ; v1(155.69,97.27) 155.69,98.326 Q2.2@155.845,98.481
  Bottom Layer w0.25: v1(146.939,84.963) 146.939,93.453 147.212,93.726 v1(152.908,93.726) ; v1(153.023,97.27) v1(155.69,97.27)
AP_EN: "AP ESP32.3" C10.1 D22.2 D23.2 R1.2 | length 33.3
  Top Layer w0.25: v1(142.442,121.591) C10.1@142.442,122.936 ; C10.1@142.442,122.831 142.682,122.591 142.787,122.591 143.204,122.174 145.161,122.174 144.836,122.499 144.393,122.499 142.482,124.41 R1.2@142.482,124.46 ; v1(142.494,102.87) 142.494,101.501 142.961,101.034 142.961,100.834 143.211,100.584 D23.2@143.411,100.584 D22.2@143.411,96.774
  Bottom Layer w0.25: v1(142.442,121.591) 142.442,102.922 v1(142.494,102.87)
AP_EN_AUTO: D23.1 Q1.3 | length 3.6
  Top Layer w0.25: D23.1@146.911,100.584 147.111,100.584 148.254,99.441 Q1.3@150.003,99.441
AP_EN_KEY: C12.2 D22.1 H6.2 SW5.3 SW5.4 | length 21.9
  Top Layer w0.25: C12.2@139.827,88.848 140.043,89.065 144.31,89.065 H6.2@144.526,89.281 144.56,89.247 148.592,89.247 SW5.4@148.626,89.213 ; D22.1@146.911,96.774 147.111,96.774 148.626,95.259 SW5.4@148.626,89.213 ; SW5.3@153.126,89.213 SW5.4@148.626,89.213
AP_GPIO0: "AP ESP32.25" D24.2 D25.2 H26.10 R17.1 | length 38.3
  Top Layer w0.25: R17.1@157.353,96.012 159.594,96.012 159.975,96.393 D24.2@160.175,96.393 160.375,96.393 160.625,96.643 160.625,96.843 163.225,99.443 163.225,100.08 163.475,100.33 D25.2@163.675,100.33 163.675,101.882 v1(162.433,103.124) ; v1(166.37,108.204) 162.661,108.204 162.961,108.204 172.105,99.06 H26.10@174.879,99.06
  Bottom Layer w0.25: v1(162.433,103.124) 166.37,107.061 v1(166.37,108.204)
AP_GPIO2: "AP ESP32.24" H26.11 | length 19.6
  Top Layer w0.25: 159.626,106.954 161.778,106.954 172.085,96.647 174.752,96.647 H26.11@174.879,96.52
AP_GPIO4: "AP ESP32.26" H26.9 | length 15.5
  Top Layer w0.25: 162.661,109.474 167.005,109.474 H26.9@174.879,101.6
AP_GPIO5: "AP ESP32.29" H26.6 | length 13.9
  Top Layer w0.25: 162.661,113.284 170.815,113.284 H26.6@174.879,109.22
AP_GPIO12: "AP ESP32.14" H25.11 | length 17.3
  Top Layer w0.25: H25.11@131.445,99.441 136.098,99.441 144.861,108.204 145.161,108.204
AP_GPIO13: "AP ESP32.16" H25.12 | length 22.4
  Top Layer w0.25: H25.12@131.445,96.901 135.509,96.901 144.018,105.41 148.222,105.41 149.466,106.654 149.466,106.954
AP_GPIO14: "AP ESP32.13" H25.10 | length 16.8
  Top Layer w0.25: H25.10@131.445,101.981 137.368,101.981 144.861,109.474 145.161,109.474
AP_GPIO15: "AP ESP32.23" H26.12 | length 22.6
  Top Layer w0.25: 158.356,106.954 158.681,106.629 158.681,105.352 159.004,105.029 162.179,105.029 173.228,93.98 H26.12@174.879,93.98
AP_GPIO16: "AP ESP32.27" H26.8 | length 15
  Top Layer w0.25: 162.661,110.744 168.275,110.744 H26.8@174.879,104.14
AP_GPIO17: "AP ESP32.28" H26.7 | length 14.4
  Top Layer w0.25: 162.661,112.014 169.545,112.014 H26.7@174.879,106.68
AP_GPIO18: "AP ESP32.30" H26.5 | length 13.4
  Top Layer w0.25: 162.661,114.554 172.085,114.554 H26.5@174.879,111.76
AP_GPIO19: "AP ESP32.31" H26.4 | length 12.8
  Top Layer w0.25: 162.661,115.824 173.355,115.824 H26.4@174.879,114.3
AP_GPIO21: "AP ESP32.33" H26.3 | length 12.8
  Top Layer w0.25: 162.661,118.364 162.961,118.364 164.485,116.84 H26.3@174.879,116.84
AP_GPIO22: "AP ESP32.36" H26.2 | length 13.4
  Top Layer w0.25: 162.661,122.174 172.085,122.174 H26.2@174.879,119.38
AP_GPIO23: "AP ESP32.37" H26.1 | length 12.8
  Top Layer w0.25: 162.661,123.444 173.355,123.444 H26.1@174.879,121.92
AP_GPIO25: "AP ESP32.10" H25.7 | length 15.2
  Top Layer w0.25: H25.7@131.445,109.601 141.178,109.601 144.861,113.284 145.161,113.284
AP_GPIO26: "AP ESP32.11" H25.8 | length 15.8
  Top Layer w0.25: H25.8@131.445,107.061 139.908,107.061 144.861,112.014 145.161,112.014
AP_GPIO27: "AP ESP32.12" H25.9 | length 16.3
  Top Layer w0.25: H25.9@131.445,104.521 138.638,104.521 144.861,110.744 145.161,110.744
AP_GPIO32: "AP ESP32.8" H25.5 | length 14.2
  Top Layer w0.25: H25.5@131.445,114.681 133.488,114.681 133.712,114.906 143.943,114.906 144.861,115.824 145.161,115.824
AP_GPIO33: "AP ESP32.9" H25.6 | length 14.7
  Top Layer w0.25: H25.6@131.445,112.141 133.858,114.554 145.161,114.554
AP_GPIO34: "AP ESP32.6" H25.3 | length 14.3
  Top Layer w0.25: H25.3@131.445,119.761 143.464,119.761 144.861,118.364 145.161,118.364
AP_GPIO35: "AP ESP32.7" H25.4 | length 13.8
  Top Layer w0.25: H25.4@131.445,117.221 145.034,117.221 145.161,117.094
AP_GPIO36: "AP ESP32.4" H25.1 | length 15.3
  Top Layer w0.25: H25.1@131.445,124.841 133.633,122.653 135.655,122.653 137.403,120.904 145.161,120.904
AP_GPIO39: "AP ESP32.5" H25.2 | length 14.8
  Top Layer w0.25: H25.2@131.445,122.301 135.509,122.301 137.697,120.113 143.61,120.113 143.763,119.959 144.836,119.959 145.161,119.634
AP_IO0_AUTO: D25.1 Q2.3 | length 2.7
  Top Layer w0.25: Q2.3@157.845,99.441 159.086,99.441 159.975,100.33 D25.1@160.175,100.33
AP_IO0_KEY: D24.1 H24.2 SW6.3 SW6.4 | length 17.7
  Top Layer w0.25: SW6.4@157.262,89.213 SW6.3@161.762,89.213 ; D24.1@163.675,96.393 163.675,90.976 161.912,89.213 SW6.3@161.762,89.213 ; H24.2@166.878,89.281 166.844,89.247 161.796,89.247 SW6.3@161.762,89.213
AP_RTS: IC3.36 Q1.2 R3.1 | length 41.8
  Top Layer w0.25: v1(147.701,84.074) 147.701,77.304 152.317,72.688 152.762,72.688 IC3.36@152.787,72.663 ; R3.1@153.047,104.14 153.047,104.09 152.003,103.046 Q1.2@152.003,100.401 152.353,100.401 152.553,100.201 152.553,99.488 153.416,98.625 153.416,97.79 154.178,97.028 v1(154.178,92.71)
  Bottom Layer w0.25: v1(147.701,84.074) 147.701,92.564 147.847,92.71 v1(154.178,92.71)
AP_RXD: IC3.35 R108.1 | length 26.3
  Top Layer w0.25: IC3.35@152.787,73.063 152.781,73.069 152.781,80.626 152.927,80.772 161.29,80.772 163.83,83.312 R108.1@170.434,83.312
AP_TXD: IC3.34 R107.1 | length 26.8
  Top Layer w0.25: IC3.34@153.537,73.813 153.512,73.838 153.512,74.113 153.46,74.113 153.289,74.284 153.289,80.118 153.435,80.264 161.671,80.264 163.83,82.423 171.685,82.423 171.91,82.648 171.91,83.137 R107.1@172.085,83.312
AP_U0RXD: "AP ESP32.34" R107.2 | length 44.8
  Top Layer w0.25: 162.661,119.634 v1(172.085,119.634) ; R107.2@172.085,84.412 172.148,84.475 172.148,91.885 v1(172.212,91.948)
  Bottom Layer w0.25: v1(172.085,119.634) 172.148,119.57 172.148,92.011 v1(172.212,91.948)
AP_U0TXD: "AP ESP32.35" R108.2 | length 44.3
  Top Layer w0.25: 162.661,120.904 v1(170.434,120.904) ; R108.2@170.434,84.412 v1(170.434,93.98)
  Bottom Layer w0.25: v1(170.434,93.98) v1(170.434,120.904)
CLIENT_DTR: IC3.21 Q6.2 R47.1 | length 132.5
  Top Layer w0.25: R47.1@51.804,93.726 51.804,93.776 54.404,96.376 55.061,96.376 Q6.2@55.261,96.576 56.967,96.576 v1(58.42,95.123) ; v1(146.304,71.501) 147.828,73.025 v1(147.828,74.549) ; v1(158.369,74.93) 158.737,74.562 IC3.21@158.737,73.813
  Bottom Layer w0.25: v1(58.42,95.123) 62.103,91.44 70.231,91.44 71.882,89.789 71.882,71.647 72.028,71.501 v1(146.304,71.501) ; v1(147.828,74.549) 147.95,74.549 148.331,74.93 153.616,74.93 153.742,74.804 154.145,74.804 154.271,74.93 v1(158.369,74.93)
CLIENT_EN: C16.1 CLIENT.3 D14.2 D15.2 R15.2 | length 44.5
  Top Layer w0.25: C16.1@40.334,121.412 46.442,121.412 CLIENT.3@46.622,121.592 45.008,121.592 43.785,122.815 43.735,122.815 43.307,123.243 v1(43.307,125.095) ; v1(42.926,100.33) 42.926,97.056 D15.2@42.954,97.028 D14.2@42.954,92.964
  Bottom Layer w0.25: v1(42.926,100.33) 42.926,124.592 43.307,124.973 v1(43.307,125.095)
CLIENT_EN_AUTO: D15.1 Q4.3 | length 3.4
  Top Layer w0.25: D15.1@46.454,97.028 48.434,97.028 49.196,97.79 Q4.3@49.546,97.79
CLIENT_EN_KEY: C35.2 D14.1 H19.2 SW1.3 SW1.4 | length 22.2
  Top Layer w0.25: C35.2@39.497,88.086 39.602,88.086 42.321,90.805 47.117,90.805 ; H19.2@43.815,88.773 47.009,88.773 47.117,88.665 ; D14.1@46.454,92.964 46.654,92.964 46.904,92.714 46.904,92.514 47.117,92.301 47.117,90.805 ; SW1.3@52.542,88.578 SW1.4@48.042,88.578 47.955,88.665 47.117,88.665 ; 47.117,88.665 47.117,90.805
CLIENT_GPIO0: CLIENT.25 D16.2 D17.2 H9.10 R49.1 | length 36.1
  Top Layer w0.25: R49.1@57.138,93.726 59.645,93.726 59.871,93.5 60.071,93.5 60.071,94.596 60.217,94.742 61.976,94.742 63.726,96.492 D17.2@63.726,98.044 63.726,100.104 v1(61.976,101.854) ; v1(62.23,107.442) 62.352,107.442 62.532,107.622 CLIENT.25@64.122,107.622 64.422,107.622 70.698,101.346 H9.10@75.311,101.346
  Bottom Layer w0.25: v1(61.976,101.854) 61.976,107.066 62.23,107.32 v1(62.23,107.442)
CLIENT_GPIO2: CLIENT.24 H9.11 | length 17.5
  Top Layer w0.25: CLIENT.24@61.087,106.372 61.087,106.072 68.353,98.806 H9.11@75.311,98.806
CLIENT_GPIO4: CLIENT.26 H9.9 | length 13.3
  Top Layer w0.25: CLIENT.26@64.122,108.892 64.422,108.892 69.428,103.886 H9.9@75.311,103.886
CLIENT_GPIO5: CLIENT.29 H9.6 | length 11.7
  Top Layer w0.25: CLIENT.29@64.122,112.702 64.422,112.702 65.618,111.506 H9.6@75.311,111.506
CLIENT_GPIO12: CLIENT.14 H7.11 | length 19.7
  Top Layer w0.25: H7.11@31.369,96.901 35.601,96.901 46.322,107.622 CLIENT.14@46.622,107.622
CLIENT_GPIO13: CLIENT.16 H7.12 | length 25.2
  Top Layer w0.25: H7.12@31.369,94.361 34.671,94.361 45.212,104.902 50.654,104.902 50.8,105.048 50.8,106.245 CLIENT.16@50.927,106.372
CLIENT_GPIO14: CLIENT.13 H7.10 | length 19.2
  Top Layer w0.25: H7.10@31.369,99.441 34.32,99.441 43.446,108.567 46.297,108.567 CLIENT.13@46.622,108.892
CLIENT_GPIO15: CLIENT.23 H9.12 | length 19.9
  Top Layer w0.25: CLIENT.23@59.817,106.372 59.817,106.072 67.435,98.454 73.123,98.454 H9.12@75.311,96.266
CLIENT_GPIO16: CLIENT.27 H9.8 | length 12.7
  Top Layer w0.25: CLIENT.27@64.122,110.162 71.575,110.162 H9.8@75.311,106.426
CLIENT_GPIO17: CLIENT.28 H9.7 | length 12.2
  Top Layer w0.25: CLIENT.28@64.122,111.432 64.422,111.432 65.34,110.514 71.721,110.514 73.268,108.966 H9.7@75.311,108.966
CLIENT_GPIO18: CLIENT.30 H9.5 | length 11.2
  Top Layer w0.25: CLIENT.30@64.122,113.972 64.196,114.046 H9.5@75.311,114.046
CLIENT_GPIO19: CLIENT.31 H9.4 | length 11.7
  Top Layer w0.25: CLIENT.31@64.122,115.242 64.422,115.242 65.766,116.586 H9.4@75.311,116.586
CLIENT_GPIO21: CLIENT.33 H4.3 H9.3 | length 21.8
  Top Layer w0.25: CLIENT.33@64.122,117.782 64.422,117.782 65.766,119.126 73.533,119.126 ; v1(71.882,120.777) 73.533,119.126 ; v1(71.882,125.349) H4.3@71.882,128.524 ; H9.3@75.311,119.126 73.533,119.126
  Bottom Layer w0.25: v1(71.882,120.777) v1(71.882,125.349)
CLIENT_GPIO22: CLIENT.36 H4.2 H9.2 | length 20
  Top Layer w0.25: CLIENT.36@64.122,121.592 64.196,121.666 74.422,121.666 74.549,121.539 76.2,121.539 76.4,121.739 76.4,126.546 H4.2@74.422,128.524
CLIENT_GPIO23: CLIENT.37 H9.1 | length 11.7
  Top Layer w0.25: CLIENT.37@64.122,122.862 64.422,122.862 65.766,124.206 H9.1@75.311,124.206
CLIENT_GPIO25: CLIENT.10 H7.7 | length 17.6
  Top Layer w0.25: H7.7@31.369,107.061 36.225,107.061 41.541,112.377 46.297,112.377 CLIENT.10@46.622,112.702
CLIENT_GPIO26: CLIENT.11 H7.8 | length 18.1
  Top Layer w0.25: H7.8@31.369,104.521 35.59,104.521 42.176,111.107 46.297,111.107 CLIENT.11@46.622,111.432
CLIENT_GPIO27: CLIENT.12 H7.9 | length 18.6
  Top Layer w0.25: H7.9@31.369,101.981 34.955,101.981 42.811,109.837 46.297,109.837 CLIENT.12@46.622,110.162
CLIENT_GPIO32: CLIENT.8 H7.5 | length 16.5
  Top Layer w0.25: H7.5@31.369,112.141 33.405,114.177 40.8,114.177 41.865,115.242 CLIENT.8@46.622,115.242
CLIENT_GPIO33: CLIENT.9 H7.6 | length 17.1
  Top Layer w0.25: H7.6@31.369,109.601 36.86,109.601 40.906,113.647 46.297,113.647 CLIENT.9@46.622,113.972
CLIENT_GPIO34: CLIENT.6 H7.3 | length 16.6
  Top Layer w0.25: H7.3@31.369,117.221 35.696,117.221 37.093,115.824 41.021,115.824 42.654,117.457 46.297,117.457 CLIENT.6@46.622,117.782
CLIENT_GPIO35: CLIENT.7 H7.4 | length 16
  Top Layer w0.25: H7.4@31.369,114.681 40.591,114.681 42.097,116.187 46.297,116.187 CLIENT.7@46.622,116.512
CLIENT_GPIO36: CLIENT.4 H7.1 | length 16.1
  Top Layer w0.25: H7.1@31.369,122.301 35.56,122.301 37.592,120.269 46.569,120.269 CLIENT.4@46.622,120.322